# Altium PCB Kindle_RX.PcbDoc
Units mm, origin at the board's own origin, x right, y up, seen from the top; angles counter-clockwise.
Board outline 32 x 58 mm, 2 copper layers (Top Layer, Bottom Layer); 11 components, 6 nets, 30 pads, 2 vias.
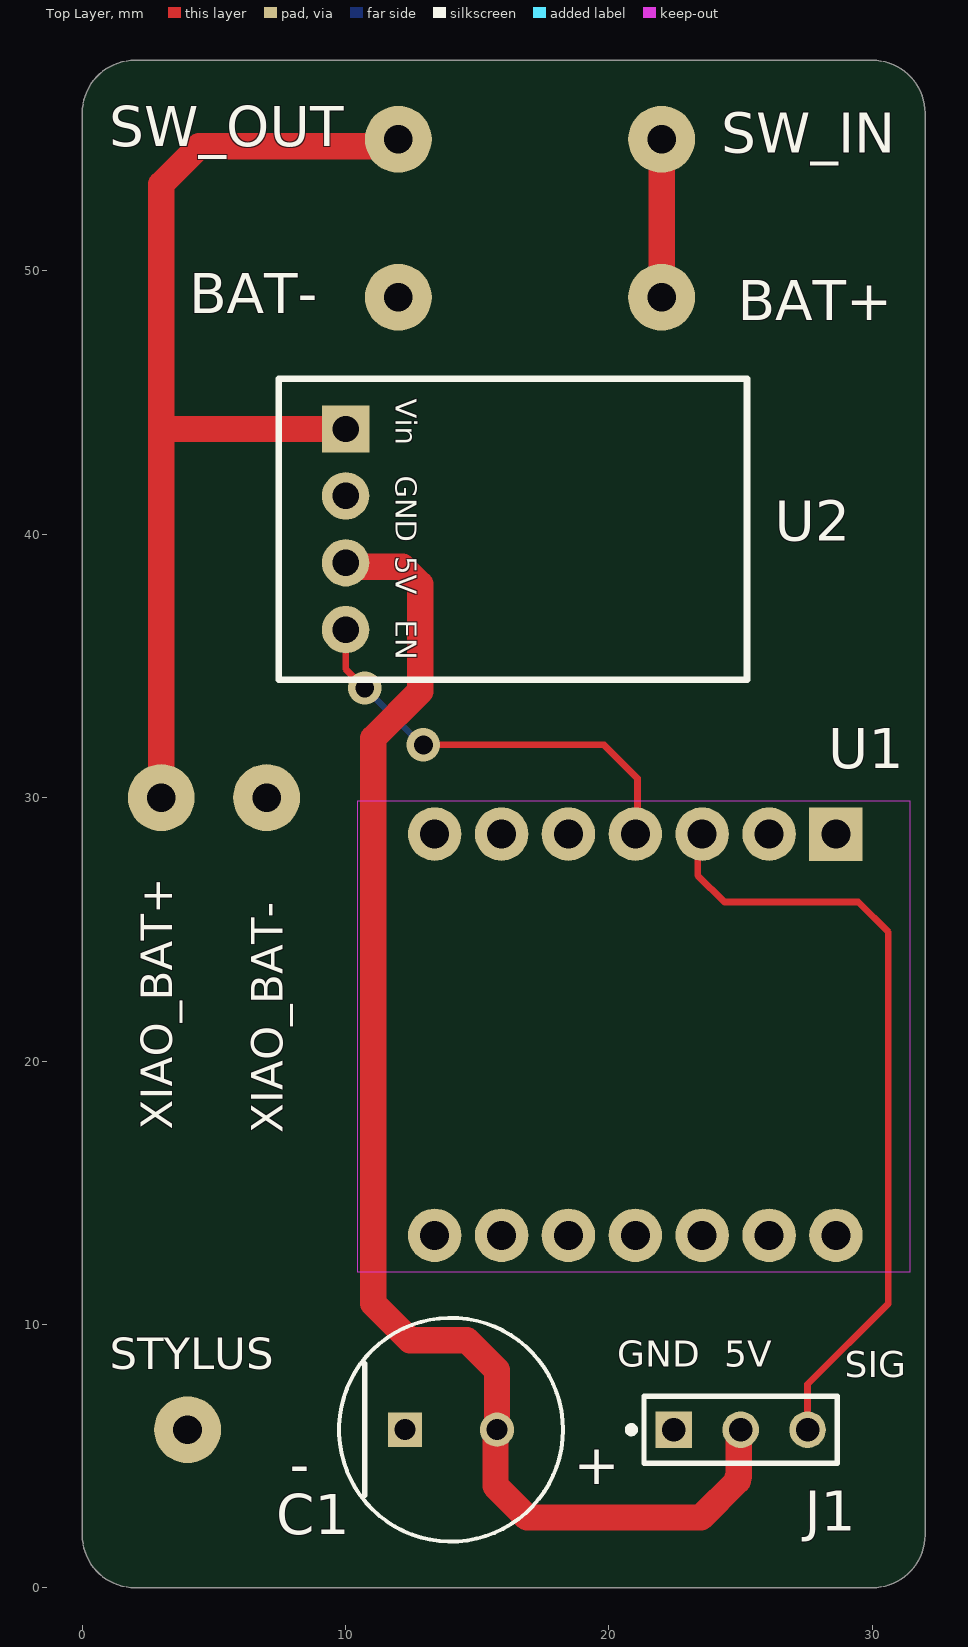
[diagram p0: Top Layer view]
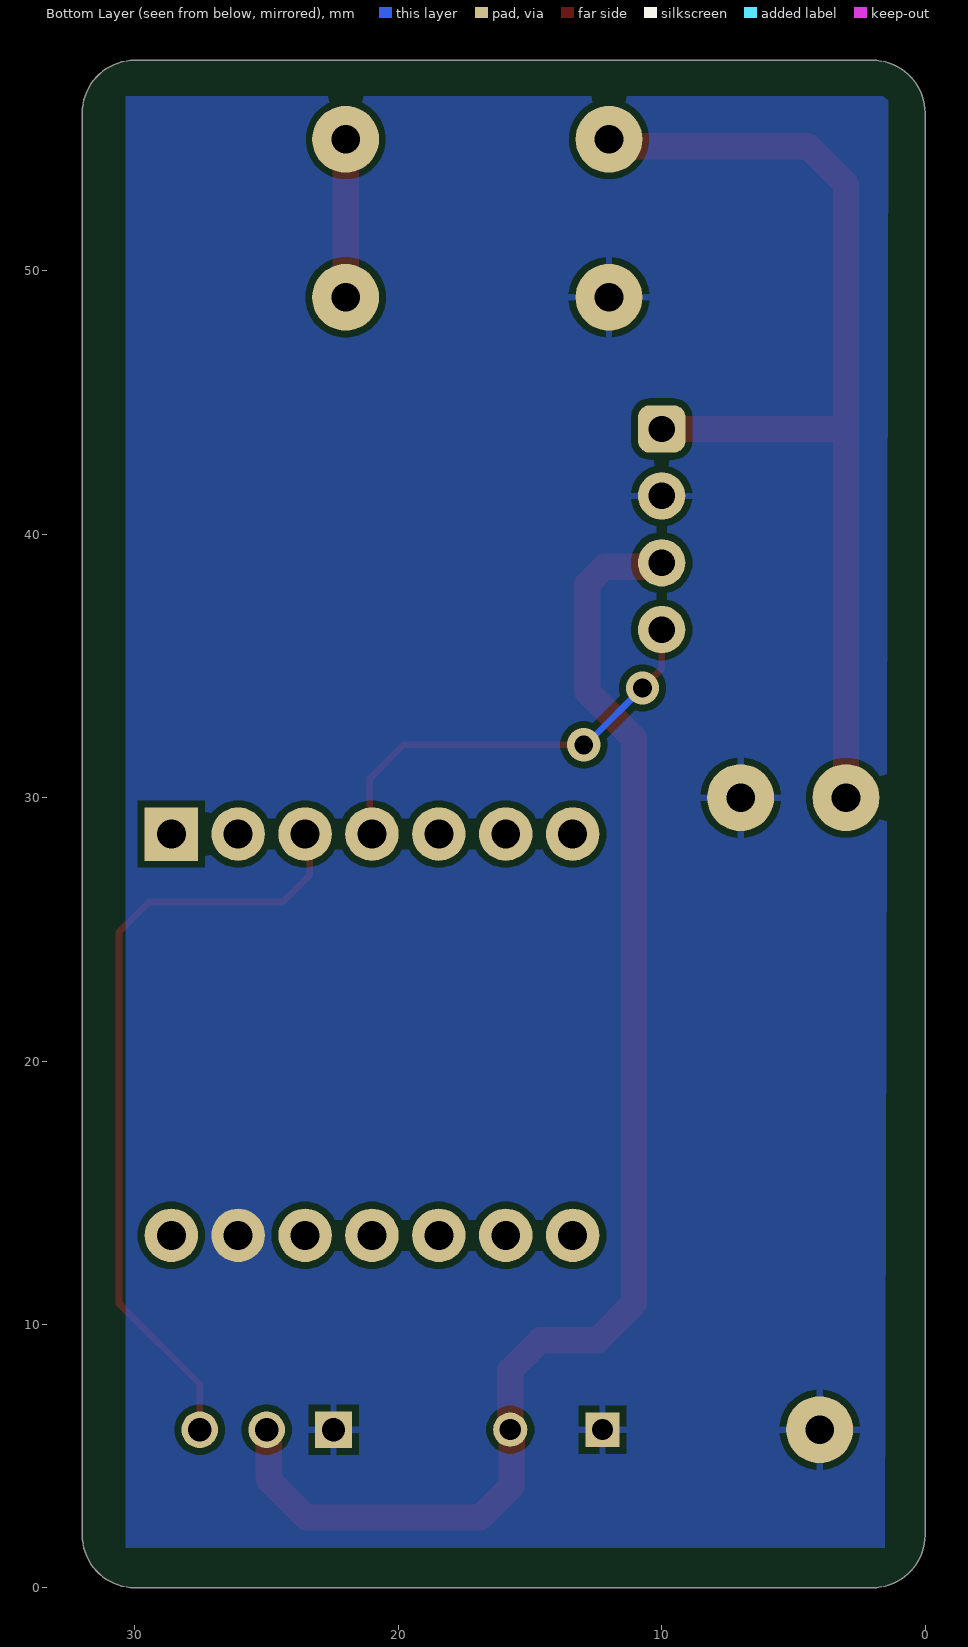
[diagram p1: Bottom Layer view, seen from below]

## Layer stack, top to bottom
Top Solder: solder mask 0.0102, Solder Resist, Dk 3.5
Top Layer: signal copper 0.0356
Dielectric 1: dielectric 0.32, FR-4, Dk 4.8
Bottom Layer: signal copper 0.0356
Bottom Solder: solder mask 0.0102, Solder Resist, Dk 3.5

## Board outline
0,2 0,56 cw(c2,56) 2,58 30,58 cw(c30,56) 32,56 32,2 cw(c30,2) 30,0 2,0 cw(c2,2)

## Design rules (kind name [scope] priority, off if disabled: settings)
Clearance [All] p1: gap=0.254 ignorepadtopadclearanceinfootprint=FALSE
PolygonConnect [All] p1: connectstyle=Relief reliefconductorwidth=0.254 reliefentries=4 polygonreliefangle="90 Angle" airgapwidth=0.254
RoutingVias [All] p1: holewidth=0.711 width=1.27 viastyle="Through Hole" minholewidth=0.711 minwidth=1.27 maxholewidth=0.711 maxwidth=1.27
SolderMaskExpansion [All] p1: expansion=0 istentingtop=FALSE
SupplyNets "Schematic Supply Nets" [InNet('GND')] p1: voltage=0.000
Width [All] p1: maxlimit=15 minlimit=0.254 preferedwidth=0.254
30 further rules are at their usual default settings.

## Components (designator, comment, footprint, x,y, rotation, side; value= is the part's Value field where it differs from the comment)
BAT+ "Solder pad" SOLDER_PAD_THT#1 132.588,72.644 r90 top
BAT- "Solder pad" SOLDER_PAD_THT#2 136.525,72.517 r90 top
C1 "EEUFR1A102L" FP-RAD-TH-D_8_0_5-L_15_1-MFG 14,6 r0 top
J1 "87224-3" FP-87224-3-MFG 25,6 r0 top
STYLUS "Solder pad" SOLDER_PAD_THT#3 111.506,52.705 r90 top
SW_IN "Solder pad" SOLDER_PAD_THT#4 20.574,53.34 r90 top
SW_OUT "Solder pad" SOLDER_PAD_THT#5 14.732,53.213 r90 top
U1 "MOUDLE-SEEEDUINO-XIAO-ESP32C3-SMD" MOUDLE14P-2-54-21X17-8MM 21,21 r0 top
U2 "Adafruit MiniBoost 5V 1A" PCBCOMPONENT_1 10,44 r270 top
XIAO_BAT+ "Solder pad" SOLDER_PAD_THT#6 5.969,35.433 r90 top
XIAO_BAT- "Solder pad" SOLDER_PAD_THT#7 5.461,65.024 r90 top

## Footprints (in the part's own frame and the unit in brackets; to place one, negate y for a bottom-side part, rotate by r counter-clockwise, add the part's x,y. Pads: shape width x height; smd on the part's side, far side on the other; paste and mask are expansions set on the pad)
FP-87224-3-MFG [mil]
  rect 54.69x54.69 hole 35 paste-99999 mask+0: 1(-100,0)
  round 54.69 hole 35 paste-99999 mask+0: 2(0,0) 3(100,0)
  silkscreen extent -168,-50 145,50, body extent -148,-54 148,54, height 10
FP-RAD-TH-D_8_0_5-L_15_1-MFG [mm]
  rect 1.3x1.3 hole 0.8 paste-2539.97 mask+0: 1(-1.75,0)
  round 1.3 hole 0.8 paste-2539.97 mask+0: 2(1.75,0)
  silkscreen extent -4.25,-4.25 4.25,4.25, body extent -4.35,-4.35 4.35,4.35, height 0.25
MOUDLE14P-2-54-21X17-8MM [mil]
  rect 80x80 hole 43.31: 1(300,300)
  round 80 hole 43.31: 2(200,300) 3(100,300) 4(0,300) 5(-100,300) 6(-200,300) 7(-300,300) 8(-300,-300) 9(-200,-300) 10(-100,-300) 11(0,-300) 12(100,-300) 13(200,-300) 14(300,-300)
  Top Layer keep-out region: -415,-355 -415,350 410,350 410,-355
PCBCOMPONENT_1 [mm]
  rect 1.8x1.8 / inner rrect50% 1.8x1.8 / far side rrect50% 1.8x1.8 hole 1: 1(0,0)
  round 1.8 hole 1: 2(2.54,0) 3(5.08,0) 4(7.62,0)
  silkscreen extent -1.91,-2.54 9.53,15.24
SOLDER_PAD_THT#1 [mil]
  round 100 hole 43: 1(-930.87,4353.86)
SOLDER_PAD_THT#2 [mil]
  round 100 hole 43: 1(-925.87,4902.56)
SOLDER_PAD_THT#3 [mil]
  round 100 hole 43: 1(-1838.78,4232.52)
SOLDER_PAD_THT#4 [mil]
  round 100 hole 43: 1(65.35,-56.14)
SOLDER_PAD_THT#5 [mil]
  round 100 hole 43: 1(70.35,107.56)
SOLDER_PAD_THT#6 [mil]
  round 100 hole 43: 1(-213.9,116.89)
SOLDER_PAD_THT#7 [mil]
  round 100 hole 43: 1(-1378.9,-60.59)

## Part data
BAT+ BAT- STYLUS SW_IN SW_OUT XIAO_BAT+ XIAO_BAT-: library part SOLDER_PAD
C1: library part CMP-05427-001033-1, "Aluminum Electrolytic Capacitors (Radial Lead Type) 1000uF ±20% 10V", Capacitance=1mF, Case/Package=Radial, ESR (Equivalent Series Resistance)=41mR, Max Operating Temperature=105°C, Min Operating Temperature=-40°C, Package Quantity=200, Ripple Current=1.24A, Tolerance=20%, Voltage=10V, Construction=RADIAL, Contact Plating=Tin, Diameter=8mm, Dissipation Factor=0.19%, Height=15mm, Height - Seated (Max)=0.65inch, Impedance=41mR, Lead Diameter=0.6mm, Lead Pitch=3.5mm, Lead/Base Style=Straight, Length=15mm, Life (Hours)=8000Hour, Mount="Through Hole", Number of Pins=2, Packaging=Bulk, Radiation Hardening=No, REACH SVHC="No SVHC", Ripple Current (AC)=1.24A, RoHS Compliant=Yes, Series=FR, Termination=Radial, Voltage Rating=10V, Voltage Rating (DC)=10V
J1: library part CMP-2000-05697-2, "CONN HEADER VERT 3POS 2.54MM", Color=Black, Contact Current Rating=3A, Flammability Rating="UL94 V-0", High Temperature Housing=No, Max Operating Temperature=105°C, Min Operating Temperature=-65°C, Package Quantity=520, Approvals=CSA, Board Standoff="No (Without)", Connector Type=Plug, Contact Gender=Male, Contact Material=Bronze, Contact Mating Length=8.08mm, Contact Plating=Gold, Contact Post Length=0.125inch, Contact Protection="No (Without)", Contact Shape=Square, Contact Type="Male Pin", Current Rating=3A, Depth=2.54mm, ELV=Compliant, Gasket="No (Without)", High Speed Serial Data Connector=No, Housing Color=Black, Housing Material=Thermoplastic, Keyed=No, Lead Free="Lead Free", Length=7.21mm, Mating Alignment="No (Without)", Mating Connector Lock="No (Without)", Mount="Through Hole", Number of Contacts=3, Number of Positions=3, Number of Rows=1, Orientation=Straight, Packaging=Carton, PCB Mount Retention=Without, PCB Mounting Orientation=Vertical, PCB Thickness=1.397mm, Pitch=2.54mm, Radiation Hardening=No, RoHS Compliant=Yes, Row Spacing=2.54mm, Selectively Loaded="No (Without)", Series="AMPMODU MOD II", Stabilizers="No (Without)", Strain Relief="No (Without)", Termination="Through Hole"
U1: Package=MOUDLE14P-SMD-2.54-21X17.8MM, DeviceName=-SMD, DeviceSetName=MOUDLE-SEEEDUINO-XIAO-ESP32C3, GateName_1=G$1, LibraryName=Seeed-Studio-XIAO-ESP32C3-footprint-eagle, SymbolName_1=MOUDLE-SEEEDUINO-XIAO-ESP32C3

## Via types
v1: diameter 1.27, hole 0.711, Top Layer to Bottom Layer, 2 vias

## Nets (pads, with @x,y where several pads share a name; then routed paths per layer and width w, separated by ;. In a path a pad name is that pad's centre, name@x,y a point inside that pad or via, vN(x,y) a via of type N, cw(c..) or ccw(c..) an arc to the next point about the centre after c; other vN are vias at no path point)
BAT_RAW: BAT+.1 SW_IN.1 | length 6
  Top Layer w1: BAT+.1 SW_IN.1
GND: BAT-.1 C1.1 J1.1 STYLUS.1 U1.13 U2.2 XIAO_BAT-.1
NetC1_2: C1.2 J1.2 U2.3 | length 53.6
  Top Layer w1: U2.3 10.153,38.767 12.16,38.767 12.827,38.1 12.827,34.036 11.049,32.258 11.049,10.795 12.446,9.398 14.605,9.398 15.748,8.255 15.748,6.002 C1.2 15.693,5.943 15.693,3.865 16.891,2.667 23.495,2.667 24.892,4.064 24.892,4.191 24.926,4.225 24.926,5.926 J1.2
NetJ1_3: J1.3 U1.3 | length 29.9
  Top Layer w0.254: U1.3 23.368,28.448 23.368,27.051 24.384,26.035 29.464,26.035 30.607,24.892 30.607,10.795 27.54,7.728 J1.3 J1.3@27.543,5.997
NetU1_4: U1.4 U2.4 | length 16.5
  Top Layer w0.254: U2.4 10,34.892 v1(10.728,34.164) ; v1(12.954,32.004) 19.812,32.004 21.082,30.734 21.082,28.702 U1.4
  Bottom Layer w0.254: v1(10.728,34.164) 12.634,32.258 12.805,32.258 12.954,32.109 v1(12.954,32.004)
VBAT_SW: SW_OUT.1 U2.1 XIAO_BAT+.1 | length 40
  Top Layer w1: XIAO_BAT+.1 3,44.069 ; U2.1 3.069,44 3,44.069 ; SW_OUT.1 11.737,54.737 4.445,54.737 3,53.292 3,44.069
pads on no net: U1.1 U1.2 U1.5 U1.6 U1.7 U1.8 U1.9 U1.10 U1.11 U1.12 U1.14

## Polygon pours and split planes (outlines as drawn)
GND on Bottom Layer "GND_L02_P002" (solid, pour order 2): 1.397,56.642 30.353,56.642 30.353,1.524 1.524,1.524

## Silkscreen, mask and mechanical layers (free items; w line width, h text height)
Top Overlay:
  text "GND" at 20.32,8.382 h1
  text "5V" at 24.384,8.382 h1
  text "SIG" at 28.956,8.001 h1
  text "-" at 7.874,3.937 h1.52
  text "+" at 18.669,3.937 h1.52
Mechanical 1:
  the board outline again, w0.254

## Text inside footprints (layer, text, board x,y; h text height)
U1: Top 3D Body "JP1" at 11.856,27.35 h1.38 r90; Top 3D Body "JP2" at 11.856,12.745 h1.38 r90
U2: Top Overlay "Vin" at 11.905,45.143 h0.8 r270; Top Overlay "5V" at 11.905,39.174 h0.8 r270; Top Overlay "GND" at 11.905,42.222 h0.8 r270; Top Overlay "EN" at 11.905,36.761 h0.8 r270